# Altium PCB a4403-ELE_PCB.PcbDoc (part 2 of 5)
Units mm, origin at the board's own origin, x right, y up, seen from the top; angles counter-clockwise.
Board outline 160 x 110 mm, 4 copper layers (Top Layer, Int1 (GND), Int2 (PWR), Bottom Layer), stack 1.369 mm thick; 389 components, 298 nets, 1653 pads, 661 vias.
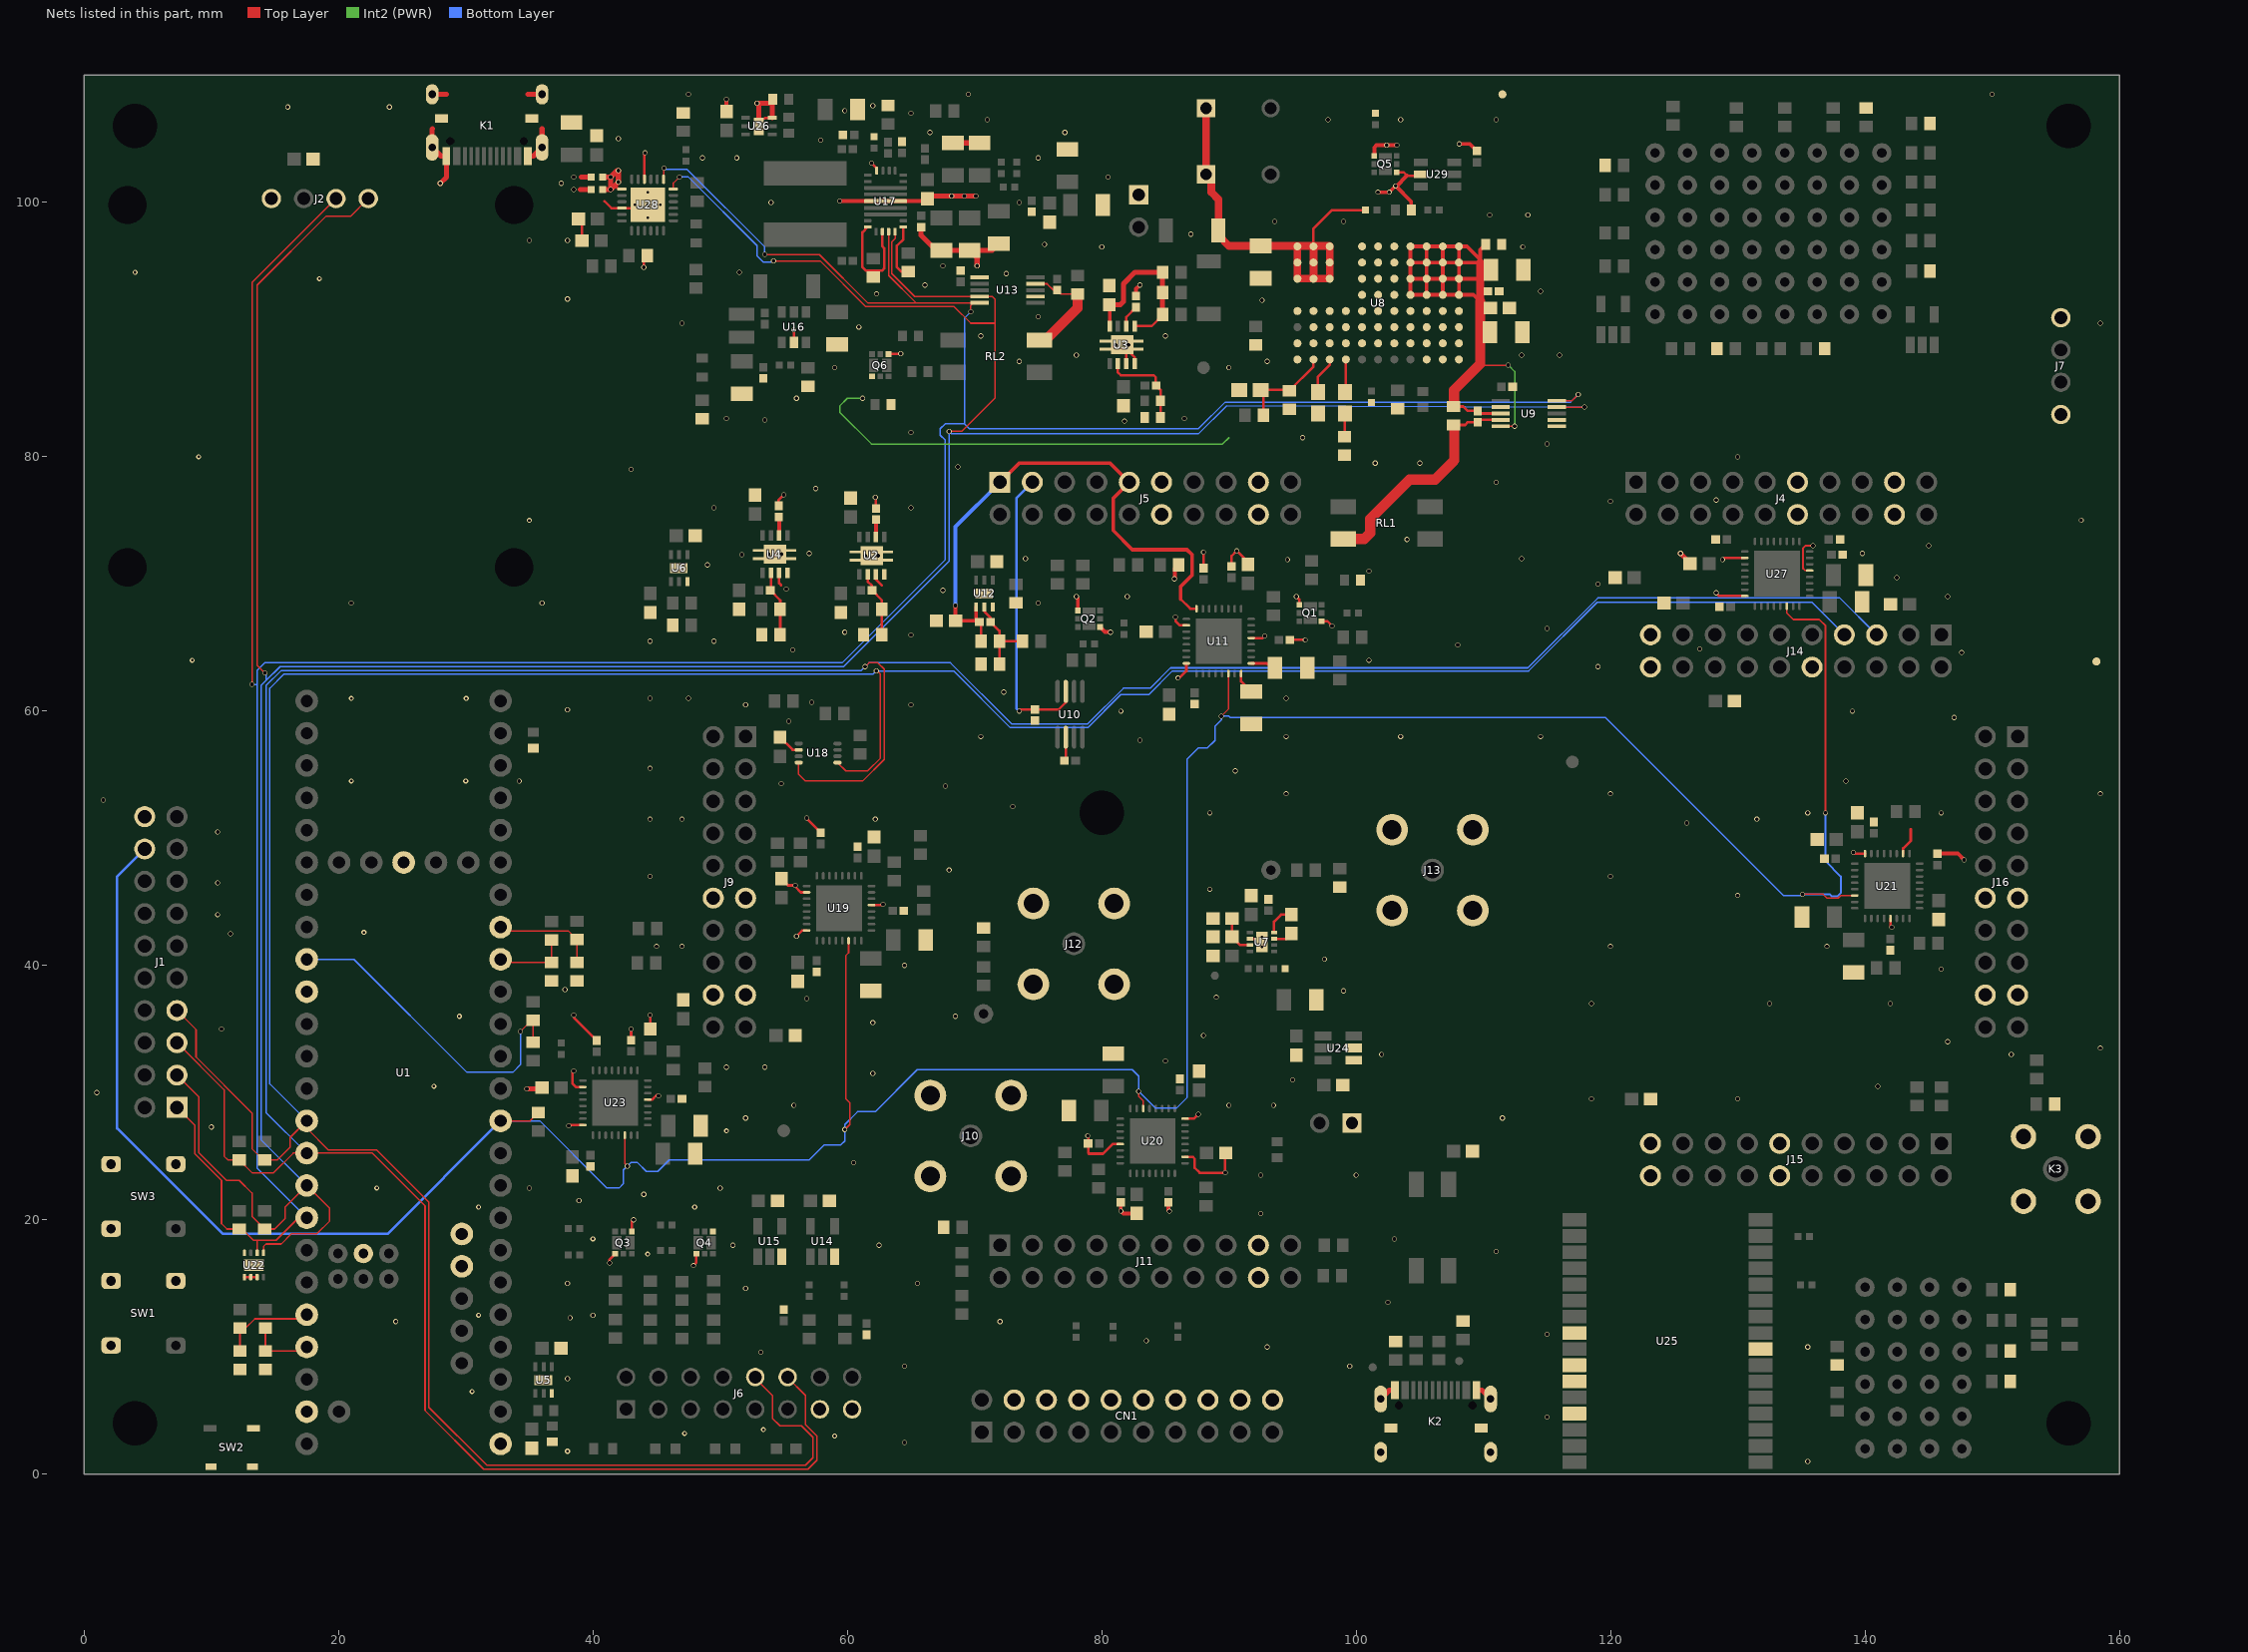
[diagram p4: the nets of this part, all layers, seen from the top]

## Part data
C1 C9 C10 C11 C19 C21 C23 C26 C40 C42 C43 C47 C51 C53 C62 C66 C67 C68 C73 C75 C76 C82 C84 C85 C87 C88 C89 C90 C95 C97 C98 C100 C103 C113 C114 C120 C122 C123 C125 C126 C127 C128 C133 C135: library part CMP-7473528-5, "CL Series 0603 1 uF 25 V ±10 % X7R Surface Mount Multilayer Ceramic Capacitor", Capacitance="1.00 µF", Capacitance Tolerance=±10%, Case/Package=0603, Dielectric Characteristic=X7R, Manufacturer Part Number=UMK107AB7105KA-T, Voltage Rating (DC)="25.0 V", Lead-Free Status="Lead Free", Mounting Style="Surface Mount", Octopart URL=http://octopart.com/cl10b105ka8nnnc-samsung-19831597, OctopartID=ce7a065e703111bd, RoHS=Compliant
C2 C6 C7 C8 C15 C16 C17 C18 C20 C45: library part CMP-7473528-7, "Generic CAP 0603, =Capacitance+','+Tolerance+','+Voltage+','+Dielectric", Capacitance="2.2 µF", Case=0603, Dielectric=X7R, Manufacturer Part Number=GRM188Z71E225KE43D, Tolerance=±10%, Voltage=25V, Lead-Free Status="Lead Free", Mounting Style="Surface Mount", Octopart URL=TBD, OctopartID=ce7a065e703111bd, RoHS=Compliant
C3 C4 C5 C12 C13 C14 C32 C46 C48: library part CMP-bf2276a55d9a60e5-20, "Generic CAP 0402, =Capacitance+','+Tolerance+','+Voltage+','+Dielectric+','+Case", Capacitance="10 nF", Case=0402, Dielectric=CGO, Manufacturer Part Number=GRM1555C1E103JE01J, Tolerance=±10%, Voltage=25V, Lead-Free Status="Lead Free", Mounting Style="Surface Mount", Octopart URL=TBD, OctopartID=0755ced2c795d892, RoHS=Compliant
C22 C25 C33 C34 C35 C37 C39 C41 C44 C49 C52 C54 C55 C56 C57 C58 C65 C70 C72 C74 C77 C80 C81 C83 C86 C92 C94 C96 C99 C102 C107 C108 C110 C117 C119 C121 C124 C130 C132 C134 C137: library part CMP-bf2276a55d9a60e5-19, "Ceramic capacitor SMD-0402 100nF /16V X7R# K +-10%, Samsung, RoHS", Capacitance="100 nF", Capacitance Tolerance=±10%, Case/Package=0402, Dielectric Characteristic=X7R, Manufacturer Part Number=CL05B104KO5NNNC, Voltage Rating (DC)="16.0 V", Lead-Free Status="Lead Free", Mounting Style="Surface Mount", Octopart URL=https://octopart.com/cl05b104ko5nnnc-samsung-9299366, OctopartID=0755ced2c795d892, RoHS=Compliant
C24 C27 C30 C36 C38 C50 C59 C60 C61 C63 C64 C69 C71 C78 C79 C91 C93 C101 C104 C105 C106 C109 C115 C116 C118 C129 C131: library part CMP-3554908-2, "Multilayer Ceramic Capacitors MLCC - SMD/SMT 1206 10uF 50volt X5R +/-10%", Capacitance="10 uF", Capacitance Tolerance=±10%, Case/Package (SI)=3216, Dielectric Characteristic=X5R, Manufacturer Part Number=CL31B106KBHNNNE, Voltage Rating (DC)="50.0 V", Lead-Free Status="Lead Free", Lifecycle Status=Active, Mounting Style="Surface Mount", Number of Pins=2, Octopart URL=https://octopart.com/grm31cr61h106ka12l-murata-18903335, OctopartID=fd8535afa9c42242, Packaging="Cut Tape (CT)", REACH SVHC Compliance="No SVHC", RoHS=Compliant, Size-Length="0.0032 m", Size-Thickness="0.0016 m", Size-Width="0.0016 m"
C28: library part CMP-7473528-7, "Generic CAP 0603, =Capacitance+','+Tolerance+','+Voltage+','+Dielectric", Capacitance=DNP, Case=0603, Dielectric=X7R, Manufacturer Part Number=TBD, Tolerance=±10%, Voltage=25V, Lead-Free Status="Lead Free", Mounting Style="Surface Mount", Octopart URL=TBD, OctopartID=ce7a065e703111bd, RoHS=Compliant
C29 C31: library part CMP-7473528-7, "Generic CAP 0603, =Capacitance+','+Tolerance+','+Voltage+','+Dielectric", Capacitance="1.5 nF", Case=0603, Dielectric=X7R, Manufacturer Part Number=GRM1885C2A152JA01D, Tolerance=±10%, Voltage=25V, Lead-Free Status="Lead Free", Mounting Style="Surface Mount", Octopart URL=TBD, OctopartID=ce7a065e703111bd, RoHS=Compliant
C111: library part CMP-bf2276a55d9a60e5-20, "Generic CAP 0402, =Capacitance+','+Tolerance+','+Voltage+','+Dielectric+','+Case", Capacitance="15 nF", Case=0402, Dielectric=CGO, Manufacturer Part Number=CGA2B3X7R1H153K050BB, Tolerance=±10%, Voltage=25V, Lead-Free Status="Lead Free", Mounting Style="Surface Mount", Octopart URL=TBD, OctopartID=0755ced2c795d892, RoHS=Compliant
C112: library part CMP-bf2276a55d9a60e5-20, "Generic CAP 0402, =Capacitance+','+Tolerance+','+Voltage+','+Dielectric+','+Case", Capacitance=DNP, Case=0402, Dielectric=CGO, Manufacturer Part Number=TBD, Tolerance=±10%, Voltage=25V, Lead-Free Status="Lead Free", Mounting Style="Surface Mount", Octopart URL=TBD, OctopartID=0755ced2c795d892, RoHS=Compliant
CN1: library part CMP-2336eab41549fcf1-2, "Male Box Header WR-BHD, THT, Vertical, pitch 2.54 mm, 20 pins", Color=Black, Contact Resistance="20.0 mΩ", Current Rating="3.00 A", Dielectric Withstanding Voltage="500 V", Flammability Rating="UL 94 V-0", Insulation Resistance="1.00 GΩ", Manufacturer Part Number=61202021621, Operating Temperature="-40.0 °C (min)", Operating Voltage="250 V", Contact Material=Copper, Contact Plating=Gold, Gender=Male, Mounting Style="Through Hole", Number of Contacts=20, Number of Pins=20, Octopart URL=https://octopart.com/61202021621-w%C3%BCrth+elektronik-8917785, OctopartID=2336eab41549fcf1, Orientation=Vertical, Packaging=Tray, Pin Pitch="2.54 mm", REACH SVHC Compliance="No SVHC", RoHS=Compliant
D1 D8 D9: "Diode", Manufacturer_Name=STMicroelectronics, Mouser Part Number=511-STTH2R02AFY, Arrow Part Number=STTH2R02AFY, Arrow Price/Stock=https://www.arrow.com/en/products/stth2r02afy/stmicroelectronics, Datasheet Link=https://www.st.com/resource/en/datasheet/stth2r02af-y.pdf, Height=1.03mm, Manufacturer Part Number=STTH2R02AFY, Mouser Price/Stock=https://www.mouser.co.uk/ProductDetail/STMicroelectronics/STTH2R02AFY?qs=pZIKbki37pqpUMRfOtxSog%3D%3D
D2 D6 D7: library part CMP-12518857-12, "Led, Green, 520 Nm, 3.2 V, 30 Ma, 430 Mcd Rohs Compliant: Yes", Manufacturer Part Number=150060GS75000
D3: library part CMP-12518863-13, "Led, Yellow, 590 Nm, 2 V, 30 Ma, 120 Mcd Rohs Compliant: Yes", Case/Package=0603, Color=Yellow, Forward Voltage="2.00 V", Manufacturer Part Number=150060YS75000, Luminous Intensity="120 mcd", Mounting Style="Surface Mount", Octopart URL=https://octopart.com/150060ys75000-w%C3%BCrth+elektronik-29687085, OctopartID=fe0f36c1264421c8, Packaging="Tape & Reel (TR)", REACH SVHC Compliance="No SVHC", RoHS=Compliant, Viewing Angle="140 °"
D4: library part CMP-1f4ad1c426c2c08d-4, "SMT Mono-color Chip Led Watercle", Manufacturer Part Number=150060RS75003, Octopart URL=https://octopart.com/150060rs75003-wurth+elektronik-126098670, OctopartID=1f4ad1c426c2c08d
D5: library part CMP-3fa7f129062de060-1, "SMT Mono-Color Chip LED Waterclear Advance", Color=Blue, Forward Current=20mA, Manufacturer Part Number=150060BS75003, Voltage=3.2V, Octopart URL=https://octopart.com/150060bs75003-wurth+elektronik-126098668, OctopartID=3fa7f129062de060
J1 J4 J5 J9 J11 J14 J15 J16: library part CMP-005cc8a3733edf9b-7, "THT Vertical Pin Header WR-PHD, Pitch 2.54 mm, Dual Row, 20 pins", Color=Black, Contact Resistance="20.0 mΩ", Current Rating="3.00 A", Dielectric Withstanding Voltage="500 V", Manufacturer Part Number=61302021121, Operating Temperature="-40.0 °C (min)", Operating Voltage="250 V", Contact Material=Copper, Contact Plating=Gold, Gender=Male, Mounting Style="Through Hole", Number of Contacts=20, Number of Pins=20, Octopart URL=https://octopart.com/61302021121-w%C3%BCrth+elektronik-32855556, OctopartID=005cc8a3733edf9b, Orientation=Vertical, Packaging=Bag, Pin Pitch="2.54 mm", REACH SVHC Compliance="No SVHC", RoHS=Compliant
J2 J7: library part CMP-2ffce6f22d89f03b-6, "2.54mm 100mil header", Color=Black, Manufacturer Part Number=TSW-102-07-G-D, Operating Temperature="125 °C (max)", Contact Material="Phosphor Bronze", Contact Plating=Gold, Gender=Male, Housing Color=Black, Housing Material=Plastic, Lead-Free Status="Lead Free", Mounting Style="Through Hole", Number of Contacts=4, Number of Positions=4, Number of Rows=2, Octopart URL=https://octopart.com/tsw-102-07-g-d-samtec-272147, OctopartID=2ffce6f22d89f03b, Packaging=Bulk, Pin Pitch="2.54 mm", REACH SVHC Compliance="No SVHC", RoHS=Compliant, Size-Height="2.54 mm", Size-Length="5.08 mm", Size-Width="5.08 mm"
J3 J17: library part CMP-876e4e6699ef58a9-5, "2 Positions Header, Unshrouded, Breakaway Connector 0.100\" (2.54mm) Through Hole Gold", Manufacturer="TE Connectivity AMP Connectors", Manufacturer Part Number=5-146280-2, Vendor Part Number=A121480-ND, Category="Connectors, Interconnects", Connector Type="Header, Unshrouded, Breakaway", Contact Finish=Gold, Contact Finish Thickness="15µin (0.38µm)", Contact Mating Length="0.230\" (5.84mm)", Contact Type="Male Pin", Cost=0.43, Family="Rectangular Connectors - Headers, Male Pins", HelpURL=http://www.te.com/commerce/DocumentDelivery/DDEController?Action=srchrtrv&DocNm=146280&DocType=Customer+Drawing&DocLang=English, Mounting Type="Through Hole", Number of Positions=2, Number of Rows=1, Octopart URL=http://octopart.com/5-146280-2-te+connectivity+%2F+amp-39436426, OctopartID=3545fe16d0a9ea82, Pitch="Header, Unshrouded, Breakaway", Vendor=Digikey
J6: library part CMP-429f8bf83f2c9d58-5, "Conn Unshrouded Header HDR 16 POS 2.54mm Solder ST Thru-Hole Poly Bag", Manufacturer Part Number=68602-116HLF, Contact Material="Phosphor Bronze", Contact Plating=Gold, Gender=Male, Mounting Style="Through Hole", Number of Contacts=16, Number of Rows=2, Octopart URL=http://octopart.com/68602-116hlf-fci-7166165, OctopartID=429f8bf83f2c9d58, Packaging=Bulk, Pin Pitch="2.54 mm", RoHS=Compliant
J10 J12 J13: library part CMP-eda0265619973267-4, "connector, rf coaxial, bnc str pcb mt recept jack, 4 legs, length .717 inch, 50 ohm", Dielectric Material=Teflon, Frequency="4.00 GHz (max)", Manufacturer Part Number=112404, ComponentLink1Description="STEP model", ComponentLink1URL=https://grabcad.com/library/amphenol-rf-4-ghz-bnc-coaxial-bulkhead-vertical-pcb-connector-1, Contact Material="Phosphor Bronze", Contact Plating=Gold, Gender=Male, Lead-Free Status="Lead Free", Mounting Style="Through Hole", Octopart URL=https://octopart.com/112404-amphenol+rf-50123089, OctopartID=eda0265619973267, RoHS=Compliant
K1: library part CMP-qyb7yekqcd84h33ugas0-6, Manufacturer Part Number=USB4105-GF-A-120, CustomComponentID=qyb7yekqcd84h33ugas0, PartId=1, ReplaceComponentId=NMLHXIMK
K2: library part CMP-qyb7yekqcd84h33ugas0-5, Manufacturer Part Number=USB4105-GF-A-120, CustomComponentID=qyb7yekqcd84h33ugas0
K3: library part CMP-0644cd817e78d983-1, "RF Connectors / Coaxial Connectors SMA ST JCK-REC 4HF CUP", Manufacturer Part Number=73391-0083, Contact Material="Beryllium Copper", Contact Plating=Gold, Gender=Female, Lifecycle Status="Not Listed by Manufacturer", Mounting Style="Solder, PCB", Octopart URL=https://octopart.com/73391-0083-molex-47144282, OctopartID=0644cd817e78d983, Orientation="Right Angle", RoHS=Compliant
L1: library part CMP-70ddb8c9bb54af1a-1, "Power inductor, shielded, 20% tol, SMT, RoHS, halogen f", Manufacturer Part Number=XAL7070-472MEB, Lead-Free Status="Contains Lead", Lifecycle Status=Active, Mounting Style="Surface Mount", Octopart URL=https://octopart.com/xal7070-472meb-coilcraft-18804463, OctopartID=70ddb8c9bb54af1a, Packaging=Reel, RoHS=Compliant
L3: library part CMP-f0983e8c5bc42f5f-1, "Inductor Power Semi-Shielded 10uH 20% 100KHz Ferrite 0.5A T/R", Manufacturer Part Number=SDCL1V2010-100M-R, Octopart URL=https://octopart.com/sdcl1v2010-100m-r-cooper+bussmann-119443002, OctopartID=f0983e8c5bc42f5f
Q1 Q2 Q3 Q4 Q5 Q6: library part CMP-7da2b0d499b7a265-2, "On a Reel of 3000, Dual N-Channel MOSFET, 5.5 A, 30 V, 8-Pin DFN ROHM UT6K3TCR", Manufacturer Part Number=UT6K3TCR, Operating Temperature="150 °C (max)", Octopart URL=https://octopart.com/ut6k3tcr-rohm-75284851, OctopartID=7da2b0d499b7a265, Polarity="Dual N-Channel", RoHS=Compliant
R1 R2 R4 R5 R90 R91: library part CMP-0800c38b3cf2d7c7-3, "Generic RES 0603, =Resistance+','+Tolerance+','+Case", Case=0603, Case/Package (SI)=1608, Manufacturer Part Number=RE0603FRE072KL, Operating Temperature="-55.0 °C to 125 °C", Power Rating="63.0 mW", Resistance="2 KΩ", Temperature Coefficient="-50.0 ppm/°C to 50.0 ppm/°C", Tolerance=±1%, Voltage=50V, ELV Compliant=Compliant, Lead-Free Status="Lead Free", Lifecycle Status=Active, Mounting Style="Surface Mount", Number of Pins=2, Octopart URL=TBD, OctopartID=a8e96364fc37772e, Packaging="Tape & Reel (TR)", REACH SVHC Compliance="No SVHC", RoHS=Compliant
R3 R10 R11 R12 R13 R28 R48 R77 R81 R88 R89 R126 R137 R143 R146: library part CMP-0800c38b3cf2d7c7-3, "Generic RES 0603, =Resistance+','+Tolerance+','+Case", Case=0603, Case/Package (SI)=1608, Manufacturer Part Number=MCT06030C1002FP500, Operating Temperature="-55.0 °C to 125 °C", Power Rating="63.0 mW", Resistance="10 KΩ", Temperature Coefficient="-50.0 ppm/°C to 50.0 ppm/°C", Tolerance=±1%, Voltage=50V, ELV Compliant=Compliant, Lead-Free Status="Lead Free", Lifecycle Status=Active, Mounting Style="Surface Mount", Number of Pins=2, Octopart URL=TBD, OctopartID=a8e96364fc37772e, Packaging="Tape & Reel (TR)", REACH SVHC Compliance="No SVHC", RoHS=Compliant
R6 R7 R8 R9 R14 R73 R76 R80: library part CMP-0800c38b3cf2d7c7-3, "Generic RES 0603, =Resistance+','+Tolerance+','+Case", Case=0603, Case/Package (SI)=1608, Manufacturer Part Number=RT0603FRE1320KL, Operating Temperature="-55.0 °C to 125 °C", Power Rating="63.0 mW", Resistance="20 KΩ", Temperature Coefficient="-50.0 ppm/°C to 50.0 ppm/°C", Tolerance=±1%, Voltage=50V, ELV Compliant=Compliant, Lead-Free Status="Lead Free", Lifecycle Status=Active, Mounting Style="Surface Mount", Number of Pins=2, Octopart URL=TBD, OctopartID=a8e96364fc37772e, Packaging="Tape & Reel (TR)", REACH SVHC Compliance="No SVHC", RoHS=Compliant
R15: library part CMP-0800c38b3cf2d7c7-3, "Generic RES 0603, =Resistance+','+Tolerance+','+Case", Case=0603, Case/Package (SI)=1608, Manufacturer Part Number=RT0603FRE079K1L, Operating Temperature="-55.0 °C to 125 °C", Power Rating="63.0 mW", Resistance="9.1 KΩ", Temperature Coefficient="-50.0 ppm/°C to 50.0 ppm/°C", Tolerance=±1%, Voltage=50V, ELV Compliant=Compliant, Lead-Free Status="Lead Free", Lifecycle Status=Active, Mounting Style="Surface Mount", Number of Pins=2, Octopart URL=TBD, OctopartID=a8e96364fc37772e, Packaging="Tape & Reel (TR)", REACH SVHC Compliance="No SVHC", RoHS=Compliant
R16: library part CMP-0800c38b3cf2d7c7-3, "Generic RES 0603, =Resistance+','+Tolerance+','+Case", Case=0603, Case/Package (SI)=1608, Manufacturer Part Number=RT0603FRE1347KL, Operating Temperature="-55.0 °C to 125 °C", Power Rating="63.0 mW", Resistance="47 KΩ", Temperature Coefficient="-50.0 ppm/°C to 50.0 ppm/°C", Tolerance=±1%, Voltage=50V, ELV Compliant=Compliant, Lead-Free Status="Lead Free", Lifecycle Status=Active, Mounting Style="Surface Mount", Number of Pins=2, Octopart URL=TBD, OctopartID=a8e96364fc37772e, Packaging="Tape & Reel (TR)", REACH SVHC Compliance="No SVHC", RoHS=Compliant
R17 R46: library part CMP-0800c38b3cf2d7c7-3, "Generic RES 0603, =Resistance+','+Tolerance+','+Case", Case=0603, Case/Package (SI)=1608, Manufacturer Part Number=MCT06030C1602FP500, Operating Temperature="-55.0 °C to 125 °C", Power Rating="63.0 mW", Resistance="16 KΩ", Temperature Coefficient="-50.0 ppm/°C to 50.0 ppm/°C", Tolerance=±1%, Voltage=50V, ELV Compliant=Compliant, Lead-Free Status="Lead Free", Lifecycle Status=Active, Mounting Style="Surface Mount", Number of Pins=2, Octopart URL=TBD, OctopartID=a8e96364fc37772e, Packaging="Tape & Reel (TR)", REACH SVHC Compliance="No SVHC", RoHS=Compliant
R18 R19 R20 R24 R25 R32 R36 R47 R49 R79 R103 R105 R124 R132: library part CMP-0800c38b3cf2d7c7-3, "Generic RES 0603, =Resistance+','+Tolerance+','+Case", Case=0603, Case/Package (SI)=1608, Manufacturer Part Number=RT0603FRE075K1L, Operating Temperature="-55.0 °C to 125 °C", Power Rating="63.0 mW", Resistance="5.1 KΩ", Temperature Coefficient="-50.0 ppm/°C to 50.0 ppm/°C", Tolerance=±1%, Voltage=50V, ELV Compliant=Compliant, Lead-Free Status="Lead Free", Lifecycle Status=Active, Mounting Style="Surface Mount", Number of Pins=2, Octopart URL=TBD, OctopartID=a8e96364fc37772e, Packaging="Tape & Reel (TR)", REACH SVHC Compliance="No SVHC", RoHS=Compliant
R21 R26 R33 R51 R63 R68 R82: library part CMP-3902036-3, "Generic RES 0402, =Resistance+','+Tolerance+','+Case", Case=0402, Manufacturer Part Number=RT0402FRE07100KL, Power="0.063 W", Resistance="100 KΩ", Tolerance=±1%, Voltage="50.0 V", Lead-Free Status="Lead Free", Mounting Style="Surface Mount", Number of Pins=2, Octopart URL=TBD, OctopartID=26dced8948c2f91b, RoHS=Compliant
R22 R29 R78: library part CMP-0800c38b3cf2d7c7-3, "Generic RES 0603, =Resistance+','+Tolerance+','+Case", Case=0603, Case/Package (SI)=1608, Manufacturer Part Number=RT0603BRE0741K2L, Operating Temperature="-55.0 °C to 125 °C", Power Rating="63.0 mW", Resistance="41.2 KΩ", Temperature Coefficient="-50.0 ppm/°C to 50.0 ppm/°C", Tolerance=±1%, Voltage=50V, ELV Compliant=Compliant, Lead-Free Status="Lead Free", Lifecycle Status=Active, Mounting Style="Surface Mount", Number of Pins=2, Octopart URL=TBD, OctopartID=a8e96364fc37772e, Packaging="Tape & Reel (TR)", REACH SVHC Compliance="No SVHC", RoHS=Compliant
R23: library part CMP-0800c38b3cf2d7c7-3, "Generic RES 0603, =Resistance+','+Tolerance+','+Case", Case=0603, Case/Package (SI)=1608, Manufacturer Part Number=RT0603FRE0725K5L, Operating Temperature="-55.0 °C to 125 °C", Power Rating="63.0 mW", Resistance="25.5 KΩ", Temperature Coefficient="-50.0 ppm/°C to 50.0 ppm/°C", Tolerance=±1%, Voltage=50V, ELV Compliant=Compliant, Lead-Free Status="Lead Free", Lifecycle Status=Active, Mounting Style="Surface Mount", Number of Pins=2, Octopart URL=TBD, OctopartID=a8e96364fc37772e, Packaging="Tape & Reel (TR)", REACH SVHC Compliance="No SVHC", RoHS=Compliant
R27 R50: library part CMP-0800c38b3cf2d7c7-3, "Generic RES 0603, =Resistance+','+Tolerance+','+Case", Case=0603, Case/Package (SI)=1608, Manufacturer Part Number=WSLP0603R0500FEB, Operating Temperature="-55.0 °C to 125 °C", Power Rating="63.0 mW", Resistance="50 mΩ", Temperature Coefficient="-50.0 ppm/°C to 50.0 ppm/°C", Tolerance=±1%, Voltage=50V, ELV Compliant=Compliant, Lead-Free Status="Lead Free", Lifecycle Status=Active, Mounting Style="Surface Mount", Number of Pins=2, Octopart URL=TBD, OctopartID=a8e96364fc37772e, Packaging="Tape & Reel (TR)", REACH SVHC Compliance="No SVHC", RoHS=Compliant
R30 R35 R83 R84 R87: library part CMP-0800c38b3cf2d7c7-3, "Generic RES 0603, =Resistance+','+Tolerance+','+Case", Case=0603, Case/Package (SI)=1608, Manufacturer Part Number=RT0603FRE10200RL, Operating Temperature="-55.0 °C to 125 °C", Power Rating="63.0 mW", Resistance="200 Ω", Temperature Coefficient="-50.0 ppm/°C to 50.0 ppm/°C", Tolerance=±1%, Voltage=50V, ELV Compliant=Compliant, Lead-Free Status="Lead Free", Lifecycle Status=Active, Mounting Style="Surface Mount", Number of Pins=2, Octopart URL=TBD, OctopartID=a8e96364fc37772e, Packaging="Tape & Reel (TR)", REACH SVHC Compliance="No SVHC", RoHS=Compliant
R31 R42 R44 R45 R94 R96 R98 R100 R109 R111 R119 R121 R122 R139 R140 R142 R145 R147 R148 R149 R150 R151 R152 R153 R154 R155 R156 R157 R158 R159 R160 R161 R162 R163 R164 R165 R166 R167 R168 R169 R170 R171: library part CMP-0800c38b3cf2d7c7-3, "Generic RES 0603, =Resistance+','+Tolerance+','+Case", Case=0603, Case/Package (SI)=1608, Manufacturer Part Number=TBD, Operating Temperature="-55.0 °C to 125 °C", Power Rating="63.0 mW", Resistance=DNP, Temperature Coefficient="-50.0 ppm/°C to 50.0 ppm/°C", Tolerance=±1%, Voltage=50V, ELV Compliant=Compliant, Lead-Free Status="Lead Free", Lifecycle Status=Active, Mounting Style="Surface Mount", Number of Pins=2, Octopart URL=TBD, OctopartID=a8e96364fc37772e, Packaging="Tape & Reel (TR)", REACH SVHC Compliance="No SVHC", RoHS=Compliant
R34: library part CMP-0800c38b3cf2d7c7-3, "Generic RES 0603, =Resistance+','+Tolerance+','+Case", Case=0603, Case/Package (SI)=1608, Manufacturer Part Number=RT0603FRE076K8L, Operating Temperature="-55.0 °C to 125 °C", Power Rating="63.0 mW", Resistance="6.8 KΩ", Temperature Coefficient="-50.0 ppm/°C to 50.0 ppm/°C", Tolerance=±1%, Voltage=50V, ELV Compliant=Compliant, Lead-Free Status="Lead Free", Lifecycle Status=Active, Mounting Style="Surface Mount", Number of Pins=2, Octopart URL=TBD, OctopartID=a8e96364fc37772e, Packaging="Tape & Reel (TR)", REACH SVHC Compliance="No SVHC", RoHS=Compliant
R37 R41 R43 R61 R62 R65 R66 R70 R71 R101 R102 R104 R127 R138: library part CMP-3902036-3, "Generic RES 0402, =Resistance+','+Tolerance+','+Case", Case=0402, Manufacturer Part Number=RT0402FRE0710RL, Power="0.063 W", Resistance="10 Ω", Tolerance=±1%, Voltage="50.0 V", Lead-Free Status="Lead Free", Mounting Style="Surface Mount", Number of Pins=2, Octopart URL=TBD, OctopartID=26dced8948c2f91b, RoHS=Compliant
R38 R39 R40 R92 R93 R95 R106 R107 R108 R110 R118 R120 R141: library part CMP-0800c38b3cf2d7c7-3, "Generic RES 0603, =Resistance+','+Tolerance+','+Case", Case=0603, Case/Package (SI)=1608, Manufacturer Part Number=CRCW06030000Z0EAC, Operating Temperature="-55.0 °C to 125 °C", Power Rating="63.0 mW", Resistance="0 Ω", Temperature Coefficient="-50.0 ppm/°C to 50.0 ppm/°C", Tolerance=±1%, Voltage=50V, ELV Compliant=Compliant, Lead-Free Status="Lead Free", Lifecycle Status=Active, Mounting Style="Surface Mount", Number of Pins=2, Octopart URL=TBD, OctopartID=a8e96364fc37772e, Packaging="Tape & Reel (TR)", REACH SVHC Compliance="No SVHC", RoHS=Compliant
R52 R53 R54 R55 R56 R57 R58 R59 R60 R64: library part CMP-0800c38b3cf2d7c7-3, "Generic RES 0603, =Resistance+','+Tolerance+','+Case", Case=0603, Case/Package (SI)=1608, Manufacturer Part Number=MCT06030C4990FP500, Operating Temperature="-55.0 °C to 125 °C", Power Rating="63.0 mW", Resistance="499 Ω", Temperature Coefficient="-50.0 ppm/°C to 50.0 ppm/°C", Tolerance=±1%, Voltage=50V, ELV Compliant=Compliant, Lead-Free Status="Lead Free", Lifecycle Status=Active, Mounting Style="Surface Mount", Number of Pins=2, Octopart URL=TBD, OctopartID=a8e96364fc37772e, Packaging="Tape & Reel (TR)", REACH SVHC Compliance="No SVHC", RoHS=Compliant
R67: library part CMP-3902036-3, "Generic RES 0402, =Resistance+','+Tolerance+','+Case", Case=0402, Manufacturer Part Number=RC0402FR-0795K3L, Power="0.063 W", Resistance="95.3 KΩ", Tolerance=±1%, Voltage="50.0 V", Lead-Free Status="Lead Free", Mounting Style="Surface Mount", Number of Pins=2, Octopart URL=TBD, OctopartID=26dced8948c2f91b, RoHS=Compliant
R69 R128 R129: library part CMP-3902036-3, "Generic RES 0402, =Resistance+','+Tolerance+','+Case", Case=0402, Manufacturer Part Number=MFSA0402R0100FAM, Power="0.063 W", Resistance="0.01 Ω", Tolerance=±1%, Voltage="50.0 V", Lead-Free Status="Lead Free", Mounting Style="Surface Mount", Number of Pins=2, Octopart URL=TBD, OctopartID=26dced8948c2f91b, RoHS=Compliant
R72 R74: "Resistor", Manufacturer_Name=Bourns, Mouser Part Number=652-PWR221T-30-33R0J, Resistance="33 Ω", Datasheet Link=https://www.bourns.com/docs/Product-Datasheets/pwr221t-30.pdf, Height=19.3mm, Manufacturer Part Number=PWR221T-30-33R0J, Mouser Price/Stock=https://www.mouser.com/Search/Refine.aspx?Keyword=652-PWR221T-30-33R0J
R75: library part CMP-3902036-3, "Generic RES 0402, =Resistance+','+Tolerance+','+Case", Case=0402, Manufacturer Part Number=TBD, Power="0.063 W", Resistance="DNP KΩ", Tolerance=±1%, Voltage="50.0 V", Lead-Free Status="Lead Free", Mounting Style="Surface Mount", Number of Pins=2, Octopart URL=TBD, OctopartID=26dced8948c2f91b, RoHS=Compliant
R85: library part CMP-3902036-3, "Generic RES 0402, =Resistance+','+Tolerance+','+Case", Case=0402, Power="0.063 W", Resistance="1 MΩ", Tolerance=±1%, Voltage="50.0 V", Lead-Free Status="Lead Free", Mounting Style="Surface Mount", Number of Pins=2, Octopart URL=TBD, OctopartID=26dced8948c2f91b, RoHS=Compliant
R86 R133 R134: library part CMP-0800c38b3cf2d7c7-3, "Generic RES 0603, =Resistance+','+Tolerance+','+Case", Case=0603, Case/Package (SI)=1608, Manufacturer Part Number=SG73S1JTTD101J, Operating Temperature="-55.0 °C to 125 °C", Power Rating="500.0 mW", Resistance="100 Ω", Temperature Coefficient="-50.0 ppm/°C to 50.0 ppm/°C", Tolerance=±1%, Voltage=50V, ELV Compliant=Compliant, Lead-Free Status="Lead Free", Lifecycle Status=Active, Mounting Style="Surface Mount", Number of Pins=2, Octopart URL=TBD, OctopartID=a8e96364fc37772e, Packaging="Tape & Reel (TR)", REACH SVHC Compliance="No SVHC", RoHS=Compliant
R97 R99 R112 R113 R114 R115 R116 R117: library part CMP-0800c38b3cf2d7c7-3, "Generic RES 0603, =Resistance+','+Tolerance+','+Case", Case=0603, Case/Package (SI)=1608, Manufacturer Part Number=AC1206FR-0749R9L, Operating Temperature="-55.0 °C to 125 °C", Power Rating="63.0 mW", Resistance="49.9 Ω", Temperature Coefficient="-50.0 ppm/°C to 50.0 ppm/°C", Tolerance=±1%, Voltage=50V, ELV Compliant=Compliant, Lead-Free Status="Lead Free", Lifecycle Status=Active, Mounting Style="Surface Mount", Number of Pins=2, Octopart URL=TBD, OctopartID=a8e96364fc37772e, Packaging="Tape & Reel (TR)", REACH SVHC Compliance="No SVHC", RoHS=Compliant
R123 R125 R131: library part CMP-0800c38b3cf2d7c7-3, "Generic RES 0603, =Resistance+','+Tolerance+','+Case", Case=0603, Case/Package (SI)=1608, Manufacturer Part Number=RT0603FRE071KL, Operating Temperature="-55.0 °C to 125 °C", Power Rating="63.0 mW", Resistance="1 KΩ", Temperature Coefficient="-50.0 ppm/°C to 50.0 ppm/°C", Tolerance=±1%, Voltage=50V, ELV Compliant=Compliant, Lead-Free Status="Lead Free", Lifecycle Status=Active, Mounting Style="Surface Mount", Number of Pins=2, Octopart URL=TBD, OctopartID=a8e96364fc37772e, Packaging="Tape & Reel (TR)", REACH SVHC Compliance="No SVHC", RoHS=Compliant
R130 R144: library part CMP-0800c38b3cf2d7c7-3, "Generic RES 0603, =Resistance+','+Tolerance+','+Case", Case=0603, Case/Package (SI)=1608, Operating Temperature="-55.0 °C to 125 °C", Power Rating="63.0 mW", Resistance=DNP, Temperature Coefficient="-50.0 ppm/°C to 50.0 ppm/°C", Tolerance=±1%, Voltage=50V, ELV Compliant=Compliant, Lead-Free Status="Lead Free", Lifecycle Status=Active, Mounting Style="Surface Mount", Number of Pins=2, Octopart URL=TBD, OctopartID=a8e96364fc37772e, Packaging="Tape & Reel (TR)", REACH SVHC Compliance="No SVHC", RoHS=Compliant
R135 R136: library part CMP-3902036-3, "Generic RES 0402, =Resistance+','+Tolerance+','+Case", Case=0402, Power="0.063 W", Resistance=DNP, Tolerance=±1%, Voltage="50.0 V", Lead-Free Status="Lead Free", Mounting Style="Surface Mount", Number of Pins=2, Octopart URL=TBD, OctopartID=26dced8948c2f91b, RoHS=Compliant
RL1 RL2 RL3: library part CMP-147564696-2, "Coto Mosfet - 1 Form A, 5A, 20V Max/ Tape-Reel", Manufacturer Part Number=C241S, Octopart URL=https://octopart.com/c241s-coto-147564696, OctopartID=147564696
SW1 SW3: library part CMP-1ee7d7ec700bc120-1, "Switch, Pushbutton, Thru-Hole Mount, SPST, PC Mount, 1000 V (RMS) (Min.)", Contact Resistance="20.0 mΩ (max)", Operating Temperature="65.0 °C (max)", Contact Material="Copper Alloy", Contact Plating="Gold over Nickel", Contacts Type=SPST, ELV Compliant=Non-Compliant, Lead-Free Status="Contains Lead", Lifecycle Status=Active, Manufacturer Part Number=TP11CGRA004, Mounting Style="Through Hole", Octopart URL=https://octopart.com/tp11cgra0-te+connectivity+%2F+alcoswitch-84874, OctopartID=1ee7d7ec700bc120, Orientation="Right Angle", Packaging=Bulk, RoHS=Non-Compliant, Size-Length="8.13 mm", Size-Width="5.08 mm"
SW2: library part CMP-8f1943a01c3050de-6, "Switch Detector Side Actuated OFF-MOM 10mA 5VDC 0.39N SPST-NO Flat Terminal Surface Mount T/R", Manufacturer Part Number=FDSD002R, Lead-Free Status="Lead Free", Octopart URL=https://octopart.com/fdsd002r-c%26k+components-95663695, OctopartID=8f1943a01c3050de, RoHS=Compliant
TP1 TP4 TP5 TPG1 TPG2: library part CMP-lokszv1vctu4w47553pe-6, "Test Point"
TP2 TP3: library part CMP-b48f7df16db76b48-3, "2.54mm (.100\") Pitch C-Grid III Header, Single Row, Vertical, 40 Circuits, Gold (Au) Plating", Current Rating="3.00 A", Manufacturer Part Number=90120-0761, Contact Material=Brass, Contact Plating=Gold, Gender=Male, Glow Wire Compliant=Non-Compliant, Halogen Free Status="Not Reviewed", Lifecycle Status="Not Listed by Manufacturer", Mounting Style="Through Hole, Vertical", Number of Circuits=40, Number of Contacts=1, Number of Rows=1, Octopart URL=http://octopart.com/90120-0761-molex-7666782, OctopartID=b48f7df16db76b48, Orientation=Vertical, RoHS=Compliant
U1: library part CMP-9ae65445f7a64521-2, "PJRC Teensy 4.1 Development Board", Manufacturer Part Number=TEENSY41, Octopart URL=https://octopart.com/teensy41-adafruit+industries-128534566, OctopartID=9ae65445f7a64521
U2 U3 U4: library part CMP-6782ad9879f0b845-2, "IC REG LDO ADJ 0.15A 8SON / LDO Regulator Pos 1.194V to 33V 0.15A 8-Pin VSON EP T/R", Dropout Voltage="300 mV", Operating Temperature="-40.0 °C to 125 °C", Output Capacitor Type=Ceramic, Quiescent Current="800.0 µA", Lead-Free Status="RoHS & Green", Lifecycle Status=Pre-Release, Manufacturer Part Number=TPS7A4901DRBR, Mounting Style="Surface Mount", Number of Pins=8, Number of Regulated Outputs=1, Octopart URL=https://octopart.com/tps7a4901drbr-texas+instruments-51395348, OctopartID=6782ad9879f0b845, Packaging="Tape & Reel (TR)", RoHS=Compliant
U5 U6 U12 U26: library part CMP-2b7ce7b2db7ff4bb-4, "LDO Regulator Pos 0.55V to 5.5V 1A 6-Pin WSON EP T/R", Case/Package=WSON, Dropout Voltage="190 mV", Operating Temperature="-40.0 °C to 125 °C", Output Capacitor Type=Ceramic, Quiescent Current="25.0 µA", Lifecycle Status=Pre-Release, Manufacturer Part Number=TLV75901PDRVR, Number of Pins=6, Number of Regulated Outputs=1, Octopart URL=https://octopart.com/tlv75901pdrvr-texas+instruments-96785765, OctopartID=2b7ce7b2db7ff4bb, RoHS=Compliant
U7: library part CMP-6c42a6b0b832b385-2, "Low-Noise regulated Switched Capacitor Voltage Inverter 8-WSON -40 to 85", Case/Package=WSON, Output Current="250 mA", Output Voltage="-5.00 V (min)", Quiescent Current="370 µA", Lead-Free Status="Lead Free", Lifecycle Status=Active, Manufacturer Part Number=LM27761DSGT, Mounting Style="Surface Mount", Number of Pins=8, Number of Regulated Outputs=1, Octopart URL=http://octopart.com/lm27761dsgt-texas+instruments-66646294, OctopartID=6c42a6b0b832b385, Packaging="Cut Tape (CT)", RoHS=Compliant
U8: library part CMP-1600243-2, "36 VIN, 5 A, 2-Quadrant CVCC Step-Down uModule Regulator, 81-pin LGA, -40 to 125 degC, Pb-Free, Tray", Output Current="5.0 A", Output Voltage="24.0 V", Manufacturer Part Number=LTM8052IV#PBF, Mounting Style="Surface Mount", Number of Outputs=1, Number of Pins=81, Octopart URL=https://octopart.com/ltm8052iv%23pbf-linear+technology-21041704, OctopartID=cd35057efa7b12f2, Packaging="Cut Tape (CT)", REACH SVHC Compliance="No SVHC", RoHS=Compliant
U9 U13: library part CMP-947c5c4360184bbb-17, "36-V, Bi-Directional, Ultra-High Accuracy, Low-/High-Side, I2C Out Current/Power Monitor w/ Alert 10-VSSOP -40 to 125", Manufacturer Part Number=INA226AIDGST
U10: library part CMP-19361507-3, "Voltage Level Translator 2-CH Bidirectional 8-Pin SSOP T/R", Case/Package=SSOP, Manufacturer Part Number=TXS0102DCTT, Operating Temperature="-40.0 °C to 85.0 °C", Output Current="1.00 mA", Supply Voltage (DC)="3.60 V (max), 1.65 V (min)", Lead-Free Status="Lead Free", Lifecycle Status=Active, Number of Bits=2, Number of Pins=8, Octopart URL=https://octopart.com/txs0102dctt-texas+instruments-7512181, OctopartID=bfd576ad3ac66012, Packaging="Cut Tape (CT), Tape & Reel (TR)", REACH SVHC Compliance="No SVHC", RoHS=Compliant
U11 U19 U20 U21 U23 U27: library part CMP-2cd8e1e00624f31f-4, "12-channel 12-Bit ADC and 12-Bit DAC, Analog PIXI, 12-Port Programmable Mixed-Signal I/O", Manufacturer Part Number=MAX11311GTJ+, Package=TQFN-32, Supply Voltage (DC)="4.75 V (max), 5.25 V (min)", Channels=12, Lead-Free Status="Lead Free", Lifecycle Status="Not Listed by Manufacturer", Number of Bits=12, Octopart URL=http://octopart.com/max11311gtj%2B-maxim+integrated-70389658, OctopartID=2cd8e1e00624f31f, Range Options="0 to 2.5V, ±5V, 0 to +10V, -10V", Resolution=12-bit, RoHS=Compliant, Sample Rate="400 kHz"
U14 U15 U30 U31 U32: library part CMP-19354130-5, "IC SCHMITT TRIG INV SOT-23-5", Case/Package=SOT-23, Manufacturer Part Number=SN74LVC1G14DBVR, Output Current="0.032 A", Output Current Drive="-0.001 A", Supply Voltage (DC)="5.0 V", Lead-Free Status="Lead Free", Lifecycle Status=Active, Mounting Style="Surface Mount", Number of Bits=1, Number of Circuits=1, Number of Gates=1, Number of Pins=5, Octopart URL=https://octopart.com/sn74lvc1g14dbvr-texas+instruments-464434, OctopartID=3234fb390160edf3, Propagation Delay Max (tpd)="5e-09 s", REACH SVHC Compliance="No SVHC", RoHS=Compliant
U16: library part CMP-0f7bc0b79604d0bc-4, "SIMPLE SWITCHER 4-V to 36-V, 1-A synchronous step-down converter 6-SOT-23 -40 to 150", Case/Package="SOT-23-6 DBV Package", Input Voltage="4.0V to 36.0V", Operating Temperature (Junction)="-40°C to 150°C", Output Current=1.0A, Output Voltage="Adjustable (SW to GND: -0.3V to VIN+0.3V)", Switching Frequency="700kHz (typ)", Lead-Free Status="Lead Free", Lifecycle Status="Not Listed by Manufacturer", Manufacturer Part Number=LMR50410XDBVR, Mounting Style="Surface Mount", Number of Outputs=1, Number of Pins=6, Octopart URL=https://octopart.com/lmr50410xdbvr-texas+instruments-113687577, OctopartID=0f7bc0b79604d0bc, Topology="Buck Converter"
U17: library part CMP-277ee9be38fdf8b9-1, "30-V 8-A buck-boost converter with I²C interface 21-VQFN-HR -40 to 125", Manufacturer Part Number=TPS55289RYQR, Lifecycle Status="Not Listed by Manufacturer", Octopart URL=https://octopart.com/tps55289ryqr-texas+instruments-130693861, OctopartID=277ee9be38fdf8b9
U18: library part CMP-1164468-4, "TCA9406 Dual Bidirectional 1-MHz I2C-BUS and SMBus Voltage Level-Translator, 1.65 to 3.6 V, -40 to 85 degC, 8-pin US8 (DCU), Green (RoHS & no Sb/Br)", Lead-Free Status="Lead Free", Lifecycle Status=Active, Manufacturer Part Number=TCA9406DCUR, Number of Outputs=2, Number of Pins=8, Octopart URL=https://octopart.com/tca9406dcur-texas+instruments-19499236, OctopartID=2214ea378f96fdd3, Packaging="Cut Tape (CT)", REACH SVHC Compliance="No SVHC", RoHS=Compliant
U22: library part CMP-0b87c75f2930d440-2, "High-accuracy upgrade to industry standard LM75 / TMP75 I2C temperature sensor 8-WSON -55 to 125", Case/Package=WSON, Manufacturer Part Number=TMP1075DSGR, Lifecycle Status=Pre-Release, Number of Pins=8, Octopart URL=https://octopart.com/tmp1075dsgr-texas+instruments-97650641, OctopartID=0b87c75f2930d440, RoHS=Compliant
U24: library part CMP-450589207bdc9ac2-1, "2.5-V low-drift low-power small-footprint series voltage reference 6-SOT-23 -40 to 125", Case/Package=SOT-23, Operating Temperature="-40.0 °C (min)", Quiescent Current="72.0 µA", Temperature Coefficient="2.50 ppm/°C", Lifecycle Status=Pre-Release, Manufacturer Part Number=REF3425IDBVR, Number of Pins=6, Octopart URL=https://octopart.com/ref3425idbvr-texas+instruments-86973375, OctopartID=450589207bdc9ac2, Packaging="Cut Tape (CT)", RoHS=Compliant
U25: library part CMP-cbab04c6b8a5146c-3, "STLINK-V3 Modular In-Circuit Debugger and Programmer for STM32 Microcontrollers", Manufacturer Part Number=STLINK-V3MODS, Lifecycle Status="Not Listed by Manufacturer", Octopart URL=https://octopart.com/stlink-v3mods-stmicroelectronics-107435624, OctopartID=cbab04c6b8a5146c
U28: library part CMP-66c0a8bd4ec7b907-1, "Usb Type-C Pd Cntrl, -40 To 105Deg C Rohs Compliant: Yes", Manufacturer Part Number=CYPD3176-24LQXQT, Octopart URL=https://octopart.com/cypd3176-24lqxqt-infineon+technologies+ag-125242721, OctopartID=66c0a8bd4ec7b907
U29: library part CMP-1345124-4, "Low Voltage, Precision Comparator with Push-Pull Output, 6-pin SOT-23, Pb-Free", Case/Package=SOT, Manufacturer="Texas Instruments", Output Current="0.04 A", DigiKey=https://www.digikey.com/en/products/detail/texas-instruments/LMV761MFX-NOPB/1872382, Lead-Free Status="Lead Free", Lifecycle Status=Active, Manufacturer Part Number=LMV761MFX/NOPB, Mounting Style="Surface Mount", Number of Channels=1, Octopart URL=https://octopart.com/lmv761mfx%2Fnopb-texas+instruments-24815957, OctopartID=23bbebcbaf88fc7c, RoHS=Compliant

## Free pads (board coordinates)
  round 1.524 hole 3 mask+2.2: 2(3.4,71.3) 2(3.4,99.8) 2(33.8,71.3) 2(33.8,99.8)
  round 1.524 hole 3.5 mask+2.2: 2(4,4) 2(4,106) 2(80,52) 2(156,4) 2(156,106)
  round 1.524 hole 0.762: 3(123.5,91.2) 3(123.5,93.74) 3(123.5,96.28) 3(123.5,98.82) 3(123.5,101.36) 3(123.5,103.9) 3(126.04,91.2) 3(126.04,93.74) 3(126.04,96.28) 3(126.04,98.82) 3(126.04,101.36) 3(126.04,103.9) 3(128.58,91.2) 3(128.58,93.74) 3(128.58,96.28) 3(128.58,98.82) 3(128.58,101.36) 3(128.58,103.9) 3(131.12,91.198) 3(131.12,93.738) 3(131.12,96.278) 3(131.12,98.818) 3(131.12,101.36) 3(131.12,103.9) 3(133.7,91.2) 3(133.7,93.74) 3(133.7,96.28) 3(133.7,98.82) 3(133.7,101.36) 3(133.7,103.9) 3(136.24,91.2) 3(136.24,93.74) 3(136.24,96.28) 3(136.24,98.82) 3(136.24,101.36) 3(136.24,103.9) 3(138.78,91.2) 3(138.78,93.74) 3(138.78,96.28) 3(138.78,98.82) 3(138.78,101.36) 3(138.78,103.9) 3(140,2) 3(140,4.54) 3(140,7.08) 3(140,9.62) 3(140,12.16) 3(140,14.7) 3(141.32,91.198) 3(141.32,93.738) 3(141.32,96.278) 3(141.32,98.818) 3(141.32,101.36) 3(141.32,103.9) 3(142.54,2) 3(142.54,4.54) 3(142.54,7.08) 3(142.54,9.62) 3(142.54,12.16) 3(142.54,14.7) 3(145.08,2) 3(145.08,4.54) 3(145.08,7.08) 3(145.08,9.62) 3(145.08,12.16) 3(145.08,14.7) 3(147.62,1.998) 3(147.62,4.538) 3(147.62,7.078) 3(147.62,9.618) 3(147.62,12.16) 3(147.62,14.7)
  round 1 smd: FID1(55,27) FID2(117,56) FID3(88,87)

## Via types
v1: diameter 0.4, hole 0.3, Top Layer to Bottom Layer, tented both sides, 576 vias
v2: diameter 0.5, hole 0.2, Top Layer to Bottom Layer, tented both sides, 59 vias
v3: diameter 0.4, hole 0.2, Top Layer to Bottom Layer, tented both sides, 24 vias
v4: diameter 0.5, hole 0.2, Top Layer to Bottom Layer, 2 vias

## Nets (pads, with @x,y where several pads share a name; then routed paths per layer and width w, separated by ;. In a path a pad name is that pad's centre, name@x,y a point inside that pad or via, vN(x,y) a via of type N, cw(c..) or ccw(c..) an arc to the next point about the centre after c; other vN are vias at no path point)
3: 
6: 
A_V3V3A: R8.1 R12.2 U1.44 | length 5.2
  Top Layer w0.12: R8.1@14.25,11.5 R12.2@14.25,9.7 17.2,9.7 U1.44@17.5,10
A_V3V3D: R9.1 R13.2 U1.43 | length 7.5
  Top Layer w0.12: R13.2@12.25,9.7 R9.1@12.25,11.5 12.7,11.5 13.417,12.217 17.177,12.217 U1.43@17.5,12.54
A_V5V: R7.1 R11.2 U1.16 | length 8.2
  Top Layer w0.12: U1.16@32.74,43.02 33.038,42.722 38.053,42.722 R7.1@38.75,42.025 R11.2@38.75,40.25
A_V6V: R6.1 R10.2 U1.15 | length 5.9
  Top Layer w0.12: U1.15@32.74,40.48 32.97,40.25 R10.2@36.75,40.25 R6.1@36.75,42
A_VNEG2V5: R89.2 R132.1 U1.32 | length 26.4
  Top Layer w0.12: v1(34.3,34.8) 35.175,35.675 R132.1@35.3,35.675 R89.2@35.3,33.95
  Bottom Layer w0.12: U1.32@17.5,40.48 21.22,40.48 30.1,31.6 33.7,31.6 34.3,32.2 v1(34.3,34.8)
ADC_INT: J1.18 R3.2 U1.10 U11.6 U19.6 U20.6 U21.6 U23.6 U27.6 | length 266.5
  Top Layer w0.12: U1.10@32.74,27.78 35.055,27.78 R3.2@35.7,28.425 ; U23.6@42.5,26.65 42.5,24.428 v1(42.703,24.224) ; v1(59.8,27.1) 60.2,27.5 60.2,29.2 59.9,29.5 59.9,40.8 60.1,41 U19.6@60.1,41.95 ; v1(82.9,30.1) 82.9,29.7 83.25,29.35 U20.6@83.25,28.75 ; v1(89.4,59.6) 89.95,60.15 U11.6@89.95,62.95 ; v1(135.1,45.6) 136.7,45.6 137,45.3 137.9,45.3 138.1,45.5 U21.6@139.2,45.5
  Top Layer w0.14: U27.6@133.85,68.25 133.85,67.712 134.362,67.2 136.4,67.2 136.9,66.7 v1(136.9,52)
  Bottom Layer w0.12: U1.10@32.74,27.78 35.82,27.78 41.1,22.5 42.059,22.5 42.4,22.841 42.4,23.921 v1(42.703,24.224) 42.979,24.5 43.5,24.5 44.2,23.8 45.1,23.8 46,24.7 57,24.7 58.2,25.9 59.5,25.9 59.8,26.2 v1(59.8,27.1) 59.8,27.5 60.8,28.5 62.2,28.5 65.5,31.8 82.4,31.8 82.9,31.3 v1(82.9,30.1) 84.2,28.8 85.9,28.8 86.7,29.6 86.7,56.2 87.6,57.1 88.3,57.1 88.9,57.7 88.9,58.8 89.4,59.3 v1(89.4,59.6) 90,59.6 90.1,59.5 119.6,59.5 133.6,45.5 135,45.5 v1(135.1,45.6)
  Bottom Layer w0.14: v1(135.1,45.6) 137.218,45.6 137.374,45.445 137.845,45.445 138.1,45.7 138.1,47 136.9,48.2 v1(136.9,52)
  Bottom Layer w0.2: J1.18@4.76,49.16 2.6,47 2.6,27.2 10.9,18.9 23.86,18.9 U1.10@32.74,27.78
GND: C1.1 C2.1 C6.1 C7.1 C8.1 C9.1 C10.1 C11.1 C12.1 C13.1 C14.1 C15.1 C16.1 C17.1 C18.1 C19.1 C20.1 C21.1 C22.1 C24.1 C25.1 C26.1 C27.1 C29.1 C30.1 C31.1 C33.1 C34.1 C35.2 C36.1 C37.2 C38.1 C39.2 C40.1 C41.2 C42.1 C43.1 C44.2 C45.1 C47.1 C49.1 C50.1 C51.1 C52.2 C53.1 C54.2 C56.2 C59.2 C60.2 C62.2 C63.2 C64.2 C65.1 C66.1 C67.1 C68.1 C69.1 C70.2 C71.1 C72.2 C73.1 C74.2 C75.1 C76.1 C77.2 C78.1 C79.1 C80.2 C81.2 C82.1 C83.2 C84.1 C85.1 C86.2 C87.1 C88.1 C89.1 C90.1 C91.1 C92.2 C93.1 C94.2 C95.1 C96.2 C97.1 C98.1 C99.2 C101.1 C102.2 C103.2 C104.2 C105.1 C106.1 C107.1 C108.1 C109.1 C112.1 C113.1 C114.1 C115.1 C116.1 C117.2 C118.1 C119.2 C120.1 C121.2 C122.1 C123.1 C124.2 C125.1 C126.1 C129.1 C130.2 C131.1 C132.2 C133.1 C134.2 C135.1 C137.2 CN1.4 CN1.6 CN1.8 CN1.10 CN1.12 CN1.14 CN1.16 CN1.18 CN1.20 J1.20 J2.1 J3.1 J4.11 J4.12 J4.17 J4.18 J5.11 J5.12 J5.17 J5.18 J6.13 J6.15 J7.1 J7.4 J9.11 J9.12 J9.17 J9.18 J10.2 J11.17 J11.18 J12.2 J13.2 J14.10 J14.19 J14.20 J15.11 J15.12 J15.19 J15.20 J16.11 J16.12 J16.17 J16.18 J17.1 K2.1 K2.2 K2.A1B12 K2.A12B1 K3.2 Q1.1 Q1.4 Q2.1 Q2.4 Q3.1 Q3.4 Q4.1 Q4.4 Q5.1 Q5.4 Q6.1 Q6.4 R10.1 R11.1 R12.1 R13.1 R14.1 R18.1 R19.1 R20.1 R24.1 R25.1 R26.1 R28.1 R31.2 R32.1 R33.1 R34.1 R45.1 R48.1 R49.1 R68.2 R73.1 R75.1 R76.1 R77.2 R79.1 R81.1 R88.1 R99.2 R103.1 R105.1 R114.2 R115.2 R117.2 R123.1 R128.2 R129.2 R137.1 R143.1 R146.1 R158.1 R159.1 R161.1 R162.1 R164.1 R165.1 R167.1 R168.1 R170.1 R171.1 SW1.2 SW1.3 SW2.A SW2.B SW2.C SW3.2 SW3.3 TPG1.1 TPG2.1 U1.0 U1.33 U1.46 U1.51 U1.52 U1.55 U1.64 U2.3 U2.4 U2.9 U3.3 U3.4 U3.9 U4.3 U4.4 U4.9 U5.3 U5.7 U6.3 U6.7 U7.2 U7.9 U8.A5 U8.A6 U8.A7 U8.A8 U8.B5 U8.B6 U8.B7 U8.B8 U8.C5 U8.C6 U8.C7 U8.C8 U8.D5 U8.D6 U8.D7 U8.E1 U8.E2 U8.E3 U8.E4 U8.E5 U8.E6 U8.E7 U8.F1 U8.F2 U8.F3 U8.F4 U8.F5 U8.F6 U8.F7 U8.G1 U8.G2 U8.G3 U8.G4 U8.G5 U8.G6 U8.G7 U8.H5 U8.H6 U8.H7 U8.J5 U8.J6 U8.J7 U8.K5 U8.K6 U8.K7 U8.L5 U8.L7 U8.L8 U9.1 U9.2 U9.7 U10.2 U11.13 U11.26 U11.32 U12.3 U12.7 U13.1 U13.7 U14.3 U15.3 U16.2 U17.2 U17.5 U17.9 U17.17 U17.21 U18.2 U19.13 U19.26 U19.32 U20.13 U20.26 U20.32 U21.13 U21.26 U21.32 U22.4 U22.5 U22.6 U22.7 U22.9 U23.13 U23.26 U23.32 U24.1 U24.2 U25.8 U25.24 U25.26 U25.27 U25.29 U26.3 U26.7 U27.13 U27.26 U27.32 U28.19 U29.2 | length 173.1
  Top Layer w0.14: U27.13@135.65,71.05 135.639,71.061 135.282,71.061 135.134,71.21 135.134,72.834 135.3,73 v1(135.9,73)
  Top Layer w0.2: U22.5@12.6,15.5 U22.6@13.1,15.5 U22.7@13.6,15.5 ; v1(38.1,27.4) 38.15,27.45 U23.32@39.2,27.45 ; v1(38.5,31.7) 38.4,31.6 38.4,30.7 38.65,30.45 U23.26@39.2,30.45 ; v1(38.5,36.1) 38.5,35.9 C119.2@40.3,34.1 ; R129.2@40.75,102 R129.2@40.8,102.05 ; v1(41.3,16.6) 41.3,16.875 Q3.1@41.75,17.325 ; v1(41.4,101) 41.427,101 41.454,101 v1@41.504,101.05 ; 41.7,101.3 41.761,101.3 42.011,101.05 U28.19@42.275,101.05 ; C121.2@43,34.13 v1(43,35) ; Q3.4@43.05,19.075 43.05,19.85 v1(43.2,20) ; U23.13@44.3,29.45 44.65,29.45 45.018,29.818 45.091,29.746 v1(45.165,29.746) ; C120.1@44.5,35 v1(44.5,36.1) ; v1(47.9,16.4) 48.135,16.635 Q4.1@48.135,17.325 ; 53.5,106.6 53.55,106.65 U26.3@54.1,106.65 ; C14.1@54.6,76.14 54.6,76.6 v1(55,77) ; U4.3@54.644,70.865 54.644,70.056 54.8,69.9 ; C66.1@54.7,57.95 55.7,56.95 U18.2@56.175,56.95 ; C73.1@54.825,46.825 55.35,46.3 v1(55.9,46.3) 55.9,46.2 56.35,45.75 U19.26@56.8,45.75 ; U16.2@55.8,89 v1(55.8,90) ; v1(56,42.3) 56.45,42.75 U19.32@56.8,42.75 ; v1(56.8,51.6) 56.8,51.54 C72.2@57.9,50.44 ; U17.21@61.6,98.06 61.194,97.654 61.194,94.906 61.45,94.65 62.75,94.65 62.9,94.8 62.9,96.4 62.75,96.55 U17.2@62.75,97.7 ; U19.13@61.9,44.75 62.75,44.75 v1(62.8,44.8) ; v1(61.9,103.1) 62.3,102.7 U17.17@62.3,102.5 ; v1(62.2,76.8) 62.25,76.75 C12.1@62.25,75.94 ; U2.3@62.25,70.75 62.25,70.35 62.7,69.9 ; Q6.4@63.235,88.075 64.175,88.075 v1(64.2,88.1) ; U17.5@64.4,98.06 64.4,97.1 63.9,96.6 63.9,94.9 64.25,94.55 R76.1@64.8,94.55 ; C34.1@77.06,56.1 77.175,56.215 U10.2@77.175,57.95 ; v1(78.9,26.6) 78.93,26.57 C80.2@78.93,26 78.93,25.27 79,25.2 80.1,25.2 80.85,25.95 U20.13@81.45,25.95 ; U3.9@81.6,88.8 U3.9@81.925,88.475 ; U3.3@81.925,87.325 U3.9@81.925,88.475 ; U3.4@82.575,87.325 82.575,87.825 U3.9@81.925,88.475 ; v1(85.8,67.4) 85.8,67.1 86.15,66.75 U11.26@86.65,66.75 ; v1(86,62.6) 86.1,62.6 86.65,63.15 U11.32@86.65,63.75 ; U20.26@86.55,24.95 87.15,24.95 87.3,24.8 87.3,24.1 87.7,23.7 v1(89.7,23.7) 89.7,25.2 C82.1@89.75,25.25 ; U20.32@86.55,27.95 87.25,27.95 v1(87.6,28.3) ; C39.2@88,71.24 v1(88,72.5) ; C41.2@90.2,71.38 90.2,72.2 v1(90.6,72.6) 91.5,71.7 C43.1@91.5,71.55 ; U7.2@91.65,42.1 92.35,42.1 U7.9@92.6,41.85 ; U11.13@91.75,65.75 92.65,65.75 v1(92.8,65.9) ; C37.2@94.8,65.6 v1(96,65.6) ; v1(95.3,69) 95.525,68.775 Q1.4@95.525,68.365 ; Q1.1@97.275,67.065 97.735,67.065 v1(98.1,66.7) ; Q5.4@103.175,102.365 103.735,102.365 104,102.1 105,102.1 U29.2@105.1,102.2 ; v1(128.3,69.3) 128.55,69.05 U27.32@130.55,69.05 ; v1(128.8,71.9) 128.95,72.05 U27.26@130.55,72.05 ; v1(139.1,48.9) 139.2,48.8 U21.32@140,48.8 ; U21.13@142,43.7 142,43.1 v1(142.1,43) ; U21.26@143,48.8 143,49.2 143.6,49.8 143.6,50.7
  Top Layer w0.3: v1(41.4,102) v1@41.419,101.981 ; v1@41.427,101 v1@41.477,101.05 ; C114.1@50.5,107.15 v1(50.5,108.1) ; v1(59.4,100.1) U17.9@63,100.1 66.1,100.1 C62.2@66.3,100.3 ; v1(78,69) 78,68.973 78.125,68.848 Q2.1@78.125,67.915 ; Q2.4@79.875,66.615 80.271,66.219 80.681,66.219 v1(80.7,66.2) ; C83.2@81.5,21.37 v1(81.5,20.7) 81.7,20.5 C85.1@82.75,20.5 ; C13.1@82.7,92.64 82.7,93.2 v1(83,93.5) ; C81.2@85.25,21.37 85.25,20.75 v1(85.325,20.675) ; v1(85.7,70.4) 85.75,70.45 85.75,71.2 R45.1@86.05,71.5 ; Q5.1@101.425,103.665 101.425,104.325 101.6,104.5 v1(102.4,104.5) v1(103.2,104.5) ; v1(101.7,100.8) v1(102.6,100.8) v1(103.1,101.3) v1@103.15,101.25 ; 104,102.1 v1@103.15,101.25 ; R81.1@104.325,99.4 104.325,100.075 v1@103.15,101.25 ; v1(108.1,104.6) 108.94,104.6 C65.1@109.5,104.04 ; C94.2@145.7,48.78 145.72,48.8 147.3,48.8 v1(147.8,48.3)
  Top Layer w0.4: v1(34.8,30.3) 35.9,30.3 C123.1@36,30.4 ; R128.2@40.75,101 v1(41.4,101) ; R129.2@40.75,102 v1(41.4,102) ; U26.7@53.05,105.975 53.05,107.65 v1(52.9,107.8) 53.85,107.8 R79.1@54.1,108.05 ; U26.3@54.1,106.65 R79.1@54.1,108.05 ; R79.1@54.15,108.1 R79.1@54.1,108.05 ; C107.1@65.8,98.06 65.8,97.4 66.975,96.225 C105.1@67.4,96.225 C106.1@69.6,96.225 ; C62.2@66.3,100.3 66.5,100.5 v1(68.2,100.5) v1(69.2,100.5) v1(70.1,100.5) ; C104.2@68.3,104.675 C63.2@70.4,104.675 ; v1(70.2,95) 70.2,95.625 C106.1@69.6,96.225 ; C64.2@71.9,96.75 71.375,96.225 C106.1@69.6,96.225 ; K2.1@101.93,5.91 102.62,6.6 K2.A1B12@103.05,6.6 ; K2.A12B1@109.45,6.6 109.88,6.6 K2.1@110.57,5.91 ; v1(125.5,72.4) 125.925,71.975 125.925,71.9 126.089,71.736 C133.1@126.164,71.736 ; v1(41.4,101) 41.7,101.3 v1(42,101.6) v1(42,102.5) 41.9,102.5 v1(41.4,102) ; v1(41.4,101) v1(41.4,102)
  Int2 (PWR) w0.12: v1(61.2,84.6) 60,84.6 59.4,84 59.4,83.5 61.9,81 89.5,81 90,81.5
  other v1: 135.5,1 64.5,2.5 115,4.5 38,7.5 64.5,8.5 99.5,8.5 53.2,9.6 93,10 135.5,10 83.5,10.5 115,11 24.5,12 72,12 38.2,12.3 40,12.5 102.5,13.5 52,14.6 38,15 65.5,15 111,17.5 51,18 62.5,18 103,18.5 92.5,20.5 38.9,21.5 44,22 35,22.5 50,22.5 92.5,23.5 100,23.5 60.5,24.5 10,27.3 52,28 111.5,28 55.8,29 90,29 93.5,29 118.5,29.5 130,29.5 1,30 141,30.5 95,31 62,31.5 50.5,32 53.5,32 85,32.5 102,33 151.5,33 158.5,33.5 146.5,34 88,34.5 10.8,35 62,35.5 68.5,36 118.5,37 132.5,37 142,37 56.8,37.4 89,37.5 99,38 37.8,38.1 146,39.7 64.5,40 97.5,40.5 45,41.5 47,41.5 120,41.5 137,41.5 11.5,42.5 10.5,44 130,45.5 88.5,46 10.5,46.5 44.5,47 120,47 68,47.5 10.5,50.5 126,51.2 44.5,51.5 47,51.5 62.2,51.5 131.5,51.5 88.5,52 135.5,52 146,52 73,52.5 1.5,53 94.5,53.5 120,53.5 158.5,53.5 67.7,54.1 54.8,54.3 34.2,54.5 138.5,54.5 90.5,55.3 44.5,55.5 83,57.7 70.5,58 94.5,58 103.5,58 114.5,58 55.4,59.2 147,59.5 81.5,60 139,60 38,60.1 52,60.5 65,60.5 57.2,60.7 44.5,61 47.5,61 94.5,61 72.3,61.5 119,63.5 101,64 147.6,64.6 55.7,64.8 127,64.9 108,65.2 44.5,65.5 49.5,65.5 65,66 59.8,66.2 115,66.5 21,68.5 36,68.5 75,68.5 82,69 146.5,69 67.5,69.5 55.2,69.6 119,70 142.5,70.5 101,71 49,71.5 94.6,71.9 74,72 113,72 61.417,72.225 62.433,72.225 51.7,72.3 53.811,72.34 54.827,72.34 57,72.4 139.8,72.4 145,73 104,73.5 157,75 49.5,76 65,76 120,76.5 128.3,76.6 57.5,77.5 111,78 43,79 68.7,79.2 101.5,79.5 105,79.5 130,80 115,81 95.8,81.5 65,81.9 81.8,82.8 53.5,82.9 50.5,83 86.5,83 56,84.6 59,87 90,87 73.5,87.5 93,87.5 78,88 113,88 116,88 81.092,88.8 82.108,88.8 70.5,89.5 85,89.5 60.9,90.2 47,90.5 158.5,90.5 75,91 92.6,92.3 38,92.4 62.3,92.8 114.5,93 66.1,93.5 72.5,94.4 51.5,94.5 67.5,95 80,96.5 113.1,96.5 75.5,96.7 87,97.5 93.6,98.5 99,98.5 110.5,99 113.5,99 54,100 73.5,100 80.5,102 48.6,103.5 51.3,103.5 75,103.5 57.9,104.9 66.5,105.5 77.1,105.5 71,106.5 97.8,106.5 103.5,106.5 111,106.5 65,107 59.8,107.2 16,107.5 24,107.5 62,107.6 69.5,108.5 150,108.5
  other v3: 38,1.8 59,3 47.2,3.2 53.4,3.5 30.5,6.5 31,12.5 44.3,17.3 40,18.5 31,21 48,21 23,22.5 50.5,27 27.5,30.5 29.5,36 22,42.6 21,54.5 30,54.5 21,61 30.04,61 8.5,64 35,75 9,80 18.5,94 4,94.5
  other v4: 92.6,41.45 92.6,42.25
GNDU: C61.1 C100.1 C127.1 C128.1 K1.1 K1.2 K1.A1B12 K1.A12B1 R126.1 R128.1 R129.1 R130.1 U28.16 U28.22 U28.25 | length 19.6
  Top Layer w0.14: R128.1@39.8,101.05 R128.1@39.85,101
  Top Layer w0.2: C100.1@39.15,97 C128.1@39.15,98.8 ; 40.9,100.1 41.45,99.55 U28.22@42.275,99.55 43.05,99.55 v2(43.3,99.8) ; v1(44,94.9) R126.1@44,95.8 ; U28.16@44.05,101.825 v1@44.05,103.85
  Top Layer w0.3: v1@44.05,103.85 v1(44.1,103.9)
  Top Layer w0.4: K1.1@27.36,108.5 28.5,108.5 ; 27.4,105.8 27.36,105.76 K1.1@27.36,104.32 28.05,103.63 K1.A12B1@28.48,103.63 28.48,101.98 v1(28,101.5) ; K1.A1B12@34.88,103.63 35.31,103.63 K1.1@36,104.32 36,105.8 ; 34.9,108.5 K1.1@36,108.5 ; 39,101 R128.1@39.85,101 ; 39.1,102 R129.1@39.85,102
  other v1: 35,97 38,97 38.5,101 37.5,101.5 38.5,102 42,105 47.5,108.5